# Altium PCB Two_Switch_Flyback.PcbDoc
Units mm, origin at the board's own origin, x right, y up, seen from the top; angles counter-clockwise.
Board outline 100 x 100 mm, 2 copper layers (Top Layer, Bottom Layer); 75 components, 28 nets, 186 pads, 20 vias.
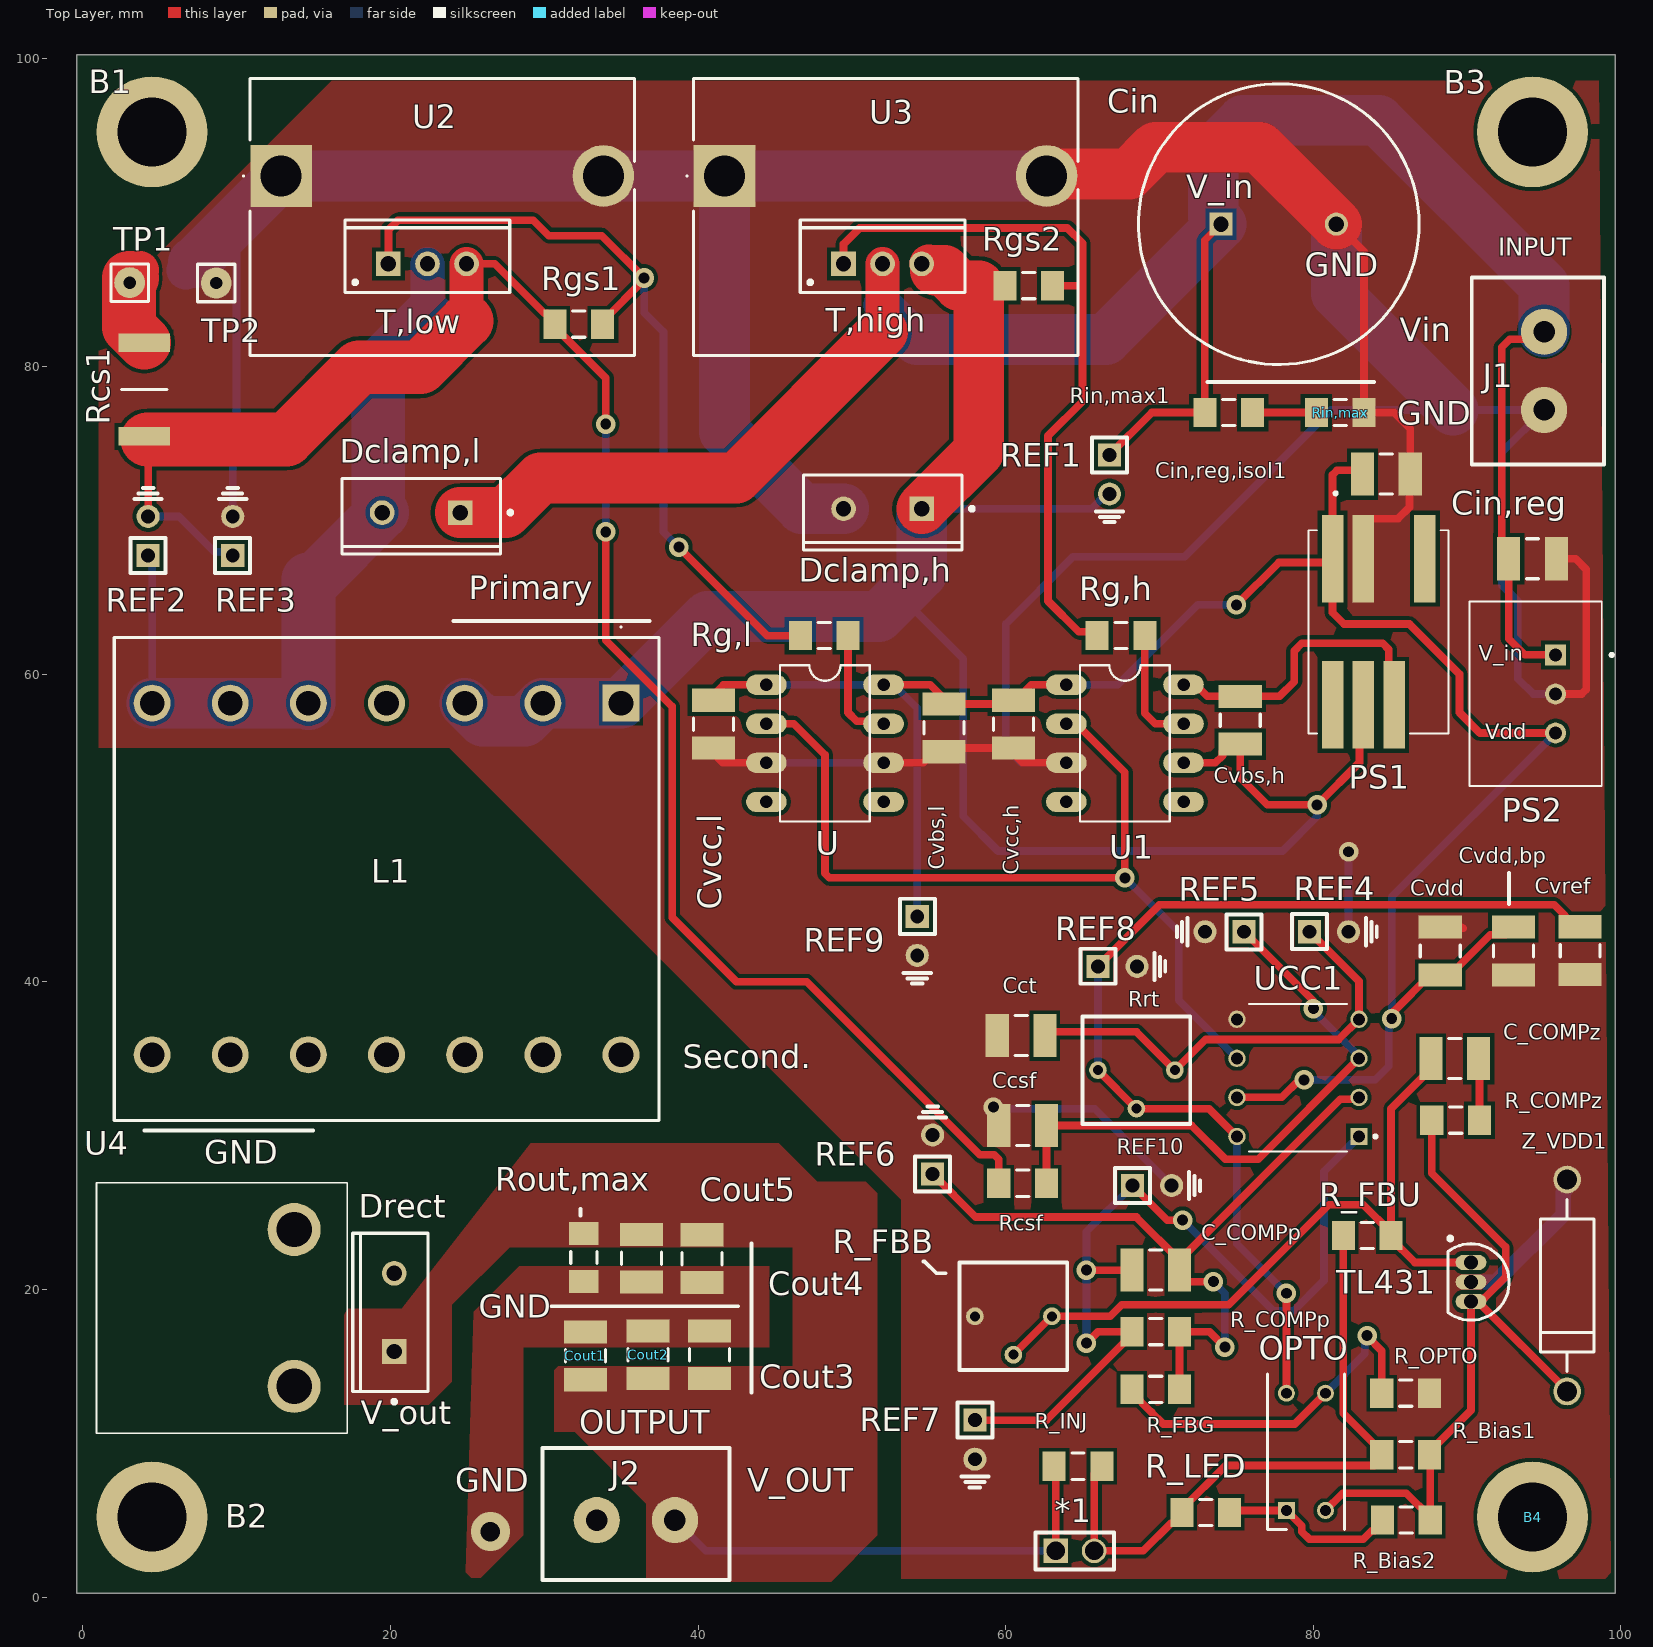
[diagram p0: Top Layer view]
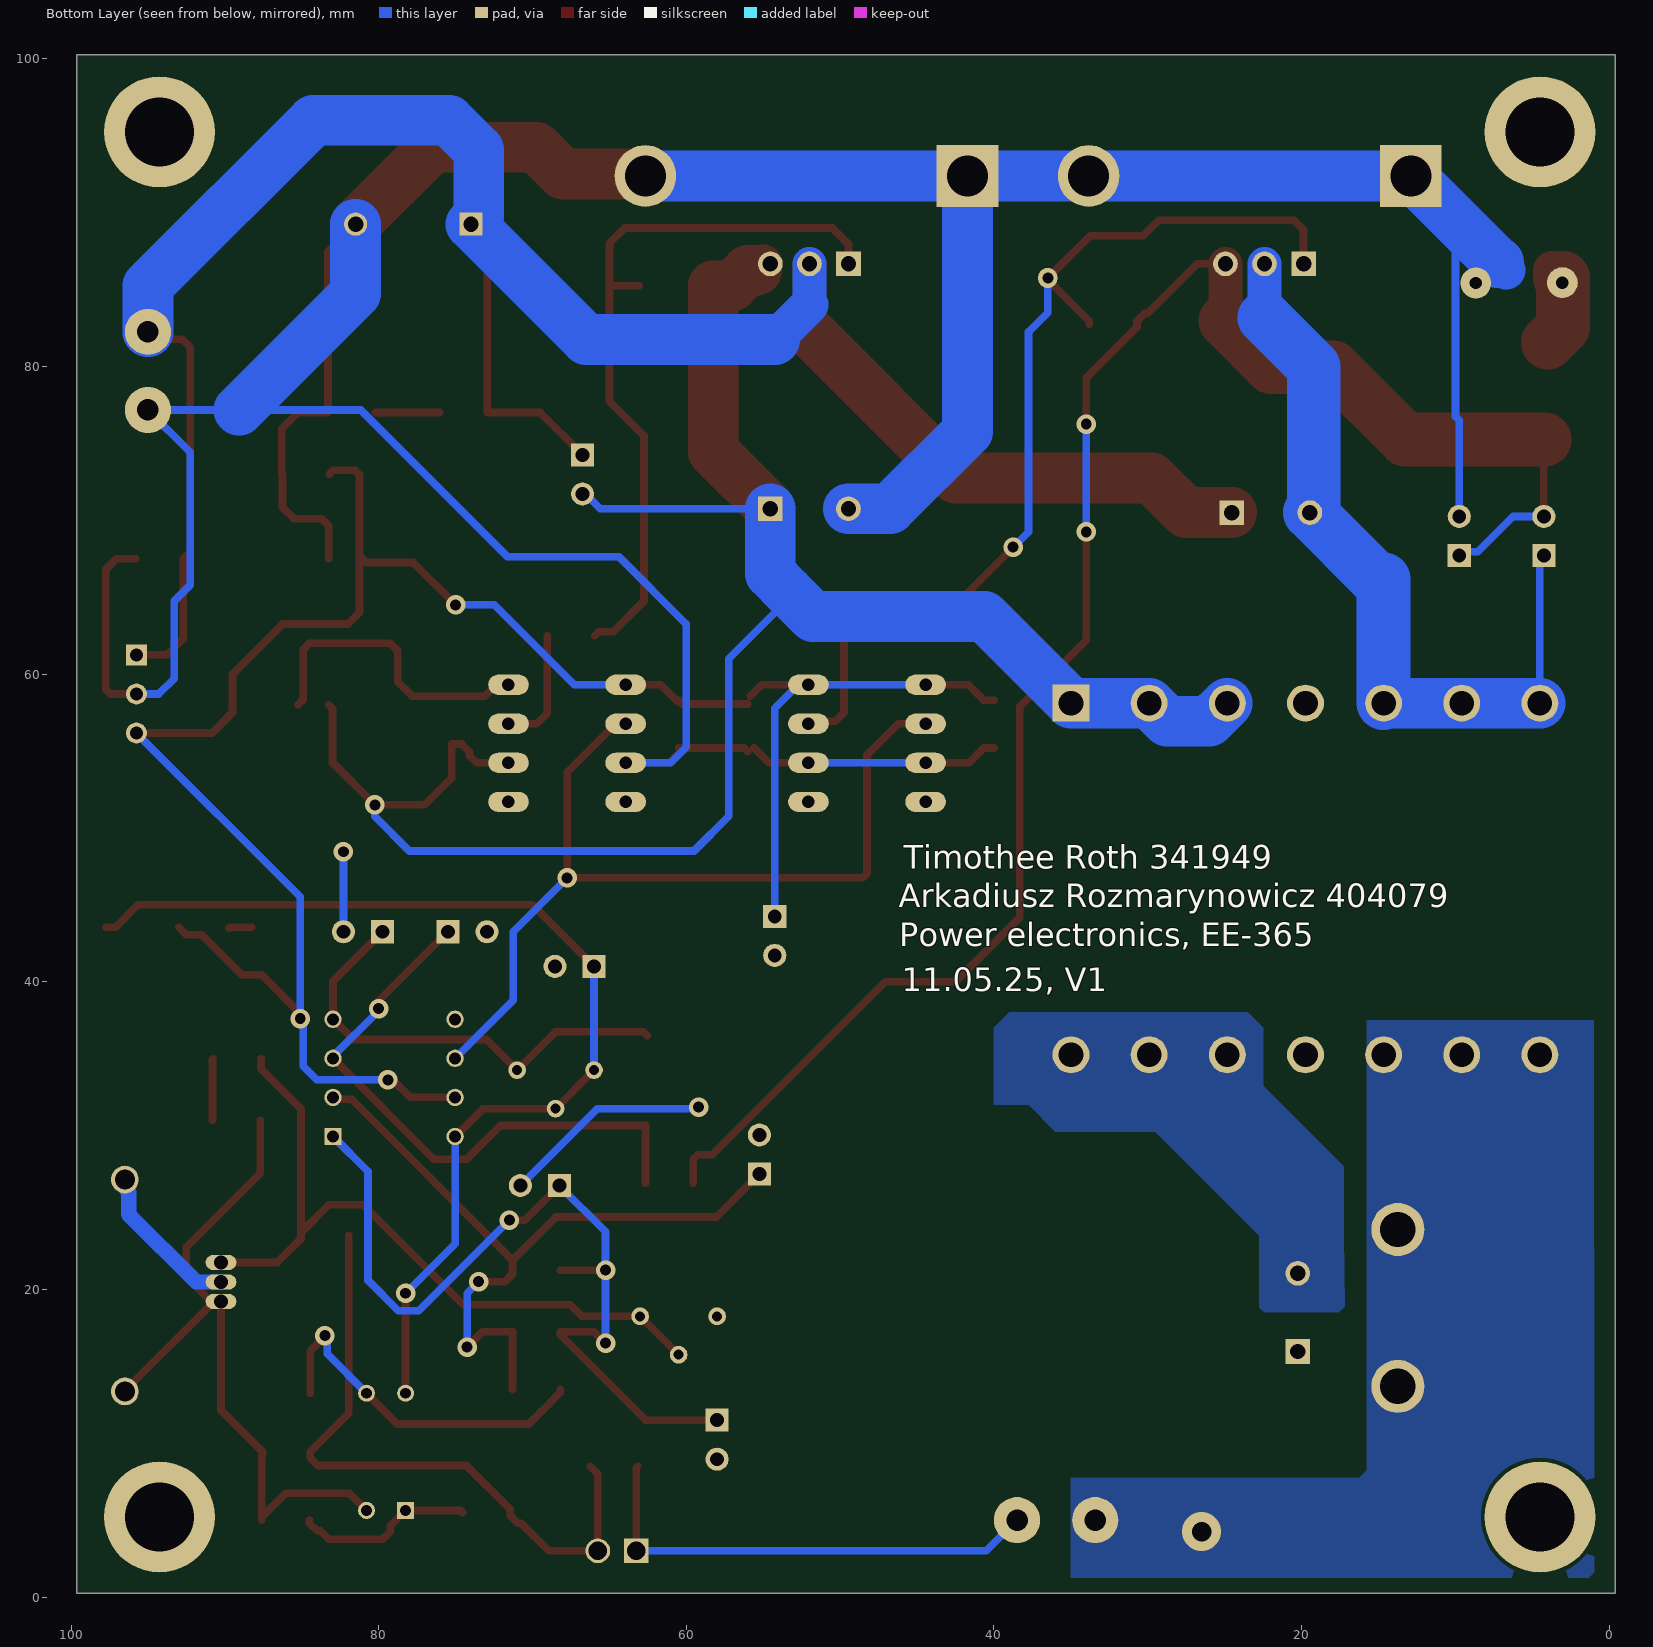
[diagram p1: Bottom Layer view, seen from below]

## Layer stack, top to bottom
Top Solder: solder mask 0.0102, Solder Resist, Dk 3.5
Top Layer: signal copper 0.0356
Dielectric 1: dielectric 0.32, FR-4, Dk 4.8
Bottom Layer: signal copper 0.0356
Bottom Solder: solder mask 0.0102, Solder Resist, Dk 3.5

## Board outline
-0.381,0.254 -0.381,100.254 99.619,100.254 99.619,0.254

## Design rules (kind name [scope] priority, off if disabled: settings)
Clearance [All] p1: gap=0.254 ignorepadtopadclearanceinfootprint=FALSE
Height [All] p1: minheight=-1 maxheight=1000 prefheight=12.7
PolygonConnect [All] p1: connectstyle=Direct reliefconductorwidth=0.254 reliefentries=4 polygonreliefangle="90 Angle" airgapwidth=0.254
RoutingVias [All] p1: holewidth=0.711 width=1.27 viastyle="Through Hole" minholewidth=0.711 minwidth=1.27 maxholewidth=0.711 maxwidth=1.27
SolderMaskExpansion [All] p1: expansion=0.102 istentingtop=FALSE
SupplyNets "Schematic Supply Nets_1" [InNet('GND_out')] p1: voltage=0.000
SupplyNets "Schematic Supply Nets_4" [InNet('Vout')] p2: voltage=0.000
SupplyNets "Schematic Supply Nets_3" [InNet('Vin')] p3: voltage=0.000
SupplyNets "Schematic Supply Nets_2" [InNet('Vdd')] p4: voltage=0.000
SupplyNets "Schematic Supply Nets" [InNet('GND')] p5: voltage=0.000
Width [All] p1: maxlimit=3.5 minlimit=0.5 preferedwidth=0.5 minimp=50.000000 maximp=50.000000 favimp=50.000000
29 further rules are at their usual default settings.

## Components (designator, comment, footprint, x,y, rotation, side; value= is the part's Value field where it differs from the comment)
*1 "Jinj" jumper 63.25,3 r90 top
B1 "" Hole#1 4.5,95.25 r0 top
B2 "" Hole#1 4.5,5.2 r0 top
B3 "" Hole#2 94.25,93.5 r0 top
B4 "" Hole#3 96,5.5 r0 top
C_COMPp "Capacitor (SMD)" SM/1210 69.75,21.25 r180 top
C_COMPz "Capacitor (SMD)" SM/1210 89.2,35 r180 top
Ccsf "Capacitor (SMD)" SM/1210 61.1,30.65 r180 top
Cct "capacitor smd" SM/1210 61,36.5 r180 top
Cin "108CKE100M" CAPPRD750W80D1825H4150 74,89.25 r0 top
Cin,reg "2,2uF 100V 1206" SM/1210 94.25,67.5 r0 top
Cin,reg,isol1 "2,2uF 100V 1210" SM/1210 84.75,73 r180 top
Cout1 "100u" SM/1210 32.675,15.675 r90 top
Cout2 "100u" SM/1210 36.75,15.75 r90 top
Cout3 "100u" SM/1210 40.75,15.75 r90 top
Cout4 "100u" SM/1210 40.25,22 r270 top
Cout5 "100u" SM/1210 36.325,22.025 r270 top
Cvbs,h "2.2uF 1206" SM/1210 75.25,57 r270 top
Cvbs,l "2.2uF 1206" SM/1210 56,56.5 r270 top
Cvcc,h "82nF 1206" SM/1210 60.5,56.75 r90 top
Cvcc,l "82nF 1206" SM/1210 41,56.75 r90 top
Cvdd "Capacitor (SMD)" SM/1210 88.25,42 r270 top
Cvdd,bp "Capacitor (SMD)" SM/1210 93,42 r90 top
Cvref "Capacitor (SMD)" SM/1210 97.35,42.025 r90 top
Dclamp,h "MBR10100G" TO-220AC 52,70.75 r270 top
Dclamp,l "MBR10100G" TO-220AC 22,70.5 r270 top
Drect "VT3045BP" TO-220AC 20.25,18.5 r180 top
J1 "" "PHOENIX  1755736" 95,82.25 r90 top
J2 "" "PHOENIX  1755736" 38.5,5 r0 top
L1 "B66232B1114T001" B66232B1114T001 34.99,58.11 r270 top
OPTO "VO617A-3" "DIP4 Socket" 78.25,5.63 r90 top
PS1 "TDN_1-4813WISM" CONV_TDN_1-4813WISM 84.25,62.75 r90 top
PS2 "TSR_0.6-48150WI" CONV_TSR_0.6-48150WI 94.45,58.71 r270 top
R_Bias1 "Resistor (SMD)" SM/1206 86,9.25 r180 top
R_Bias2 "Resistor (SMD)" SM/1206 86.05,5 r180 top
R_COMPp "Resistor (SMD)" SM/1206 69.75,17.25 r0 top
R_COMPz "Resistor (SMD)" SM/1206 89.25,31 r0 top
R_FBB "5k" "TRIMMER CT-6EP" 60.5,18.25 r180 top
R_FBG "Resistor (SMD)" SM/1206 69.75,13.5 r180 top
R_FBU "Resistor (SMD)" SM/1206 83.5,23.5 r180 top
R_INJ "Resistor (SMD)" SM/1206 64.7,8.5 r180 top
R_LED "Resistor (SMD)" SM/1206 73,5.5 r180 top
R_OPTO "Resistor (SMD)" SM/1206 86,13.25 r180 top
Rcs1 "CSRN2512FKR200" RESC6432X70N 4,78.5 r270 top
Rcsf "Resistor (SMD)" SM/1206 61.1,26.9 r0 top
REF1 "Test Point" "TESTPOINT HDR1X2" 66.75,74.25 r270 top
REF2 "Test Point" "TESTPOINT HDR1X2" 4.25,67.71 r90 top
REF3 "Test Point" "TESTPOINT HDR1X2" 9.75,67.71 r90 top
REF4 "Test Point" "TESTPOINT HDR1X2" 79.75,43.25 r0 top
REF5 "Test Point" "TESTPOINT HDR1X2" 75.5,43.25 r180 top
REF6 "Test Point" "TESTPOINT HDR1X2" 55.25,27.5 r90 top
REF7 "Test Point" "TESTPOINT HDR1X2" 58,11.5 r270 top
REF8 "Test Point" "TESTPOINT HDR1X2" 66,41 r0 top
REF9 "Test Point" "TESTPOINT HDR1X2" 54.25,44.25 r270 top
REF10 "Test Point" "TESTPOINT HDR1X2" 68.25,26.75 r0 top
Rg,h "Resistor (SMD)" SM/1206 67.5,62.5 r0 top
Rg,l "Resistor (SMD)" SM/1206 48.2,62.5 r0 top
Rgs1 "1206" SM/1206 32.25,82.75 r180 top
Rgs2 "1206" SM/1206 61.5,85.25 r0 top
Rin,max "Resistor (SMD)" SM/1206 81.75,77 r0 top
Rin,max1 "Resistor (SMD)" SM/1206 74.5,77 r0 top
Rout,max "Resistor (SMD)" SM/1206 32.575,22.075 r270 top
Rrt "5k" "TRIMMER CT-6EP" 68.5,34.25 r180 top
T,high "SiHF530" TO-220AB 51.995,86.667 r0 top locked
T,low "SiHF530" TO-220AB 22.411,86.667 r0 top locked
TL431 "TL431" "TO-92 Straight Lead" 90.25,20.48 r180 top
TP1 "net?" MY_TestPin 3.05,85.45 r90 top
TP2 "net?" MY_TestPin 8.675,85.425 r0 top
U "IR2117" DIL08 48.25,55.5 r270 top
U1 "IR2117" DIL08 67.75,55.5 r270 top
U2 "OMNI-220-18-25-1C" OMNI22018251C 12.901,92.382 r0 top locked
U3 "OMNI-220-18-25-1C" OMNI22018251C 41.723,92.382 r0 top
U4 "E2A-T220-25E" E2AT22025E 13.745,23.894 r180 top
UCC1 "PWM Controller" "UCCx8C4x PDIP Package" 79,33.75 r180 top
Z_VDD1 "D Zener" "DO-15 Package (D0-204AC)" 96.5,20.25 r90 top

## Footprints (in the part's own frame and the unit in brackets; to place one, negate y for a bottom-side part, rotate by r counter-clockwise, add the part's x,y. Pads: shape width x height; smd on the part's side, far side on the other; paste and mask are expansions set on the pad)
B66232B1114T001 [mm]
  rect 2.4x2.4 hole 1.6: 1(0,0)
  round 2.4 hole 1.6: 2(0,-5.08) 3(0,-10.16) 4(0,-15.24) 5(0,-20.32) 6(0,-25.4) 7(0,-30.48) 8(22.86,-30.48) 9(22.86,-25.4) 10(22.86,-20.32) 11(22.86,-15.24) 12(22.86,-10.16) 13(22.86,-5.08) 14(22.86,0)
  silkscreen extent -5,-32.94 27.13,2.46, body extent -4.27,-32.94 27.13,2.46, height 20.1
CAPPRD750W80D1825H4150 [mm]
  rect 1.5x1.5 hole 1: 1(0,0)
  round 1.5 hole 1: 2(7.5,0)
  silkscreen extent -5.37,-9.12 12.88,9.12, body extent -5.48,-9.24 13,9.24, height 41.5
CONV_TDN_1-4813WISM [mm]
  rect 5.7x1.4 smd: 1(4.75,3) 2(4.75,1) 4(4.75,-3) 5(-4.75,3) 6(-4.75,1) 7(-4.75,-1)
  silkscreen extent -6.6,-4.55 9.1,4.55, body extent -7.1,-4.55 7.1,4.55, height 10.2
CONV_TSR_0.6-48150WI [mm]
  rect 1.358x1.358 hole 0.85: 1(-2.54,1.3)
  round 1.358 hole 0.85: 2(0,1.3) 3(2.54,1.3)
  silkscreen extent -6,-4.3 6,5.05
DIL08 [mil]
  oval 52x104 hole 32: 1(-150,-150) 2(-50,-150) 3(50,-150) 4(150,-150) 5(150,150) 6(50,150) 7(-50,150) 8(-150,150)
  silkscreen extent -200,-115 200,115
"DIP4 Socket" [mm]
  rect 1.1x1.1 hole 0.7: 1(0,0)
  round 1.1 hole 0.7: 2(0,-2.54) 3(7.62,-2.54) 4(7.62,0)
  silkscreen extent -1.24,-3.77 8.86,1.23
"DO-15 Package (D0-204AC)" [mm]
  round 1.8 hole 1.3: 1(-6.887,0) 2(6.887,0)
  silkscreen extent -5.59,-1.75 5.59,1.75
E2AT22025E [mm]
  round 3.45 hole 2.3: 1(0,0) 2(0,10.2)
  silkscreen extent -3.45,-3.05 12.85,13.25, body extent -3.43,-3.02 12.85,13.24, height 25.67
Hole#1 [mm]
  round 7.2 hole 4.5: 1(0,0)
Hole#2 [mm]
  round 7.2 hole 4.5: 1(0,1.75)
Hole#3 [mm]
  round 7.2 hole 4.5: 1(-1.75,-0.3)
jumper [mm]
  rect 1.6x1.6 hole 1.2: 1(0,0)
  round 1.6 hole 1.2: 2(0,-2.5)
  silkscreen extent -1.2,-3.8 1.2,1.3
MY_TestPin [mil]
  round 79 hole 31.5: 1(0,0)
  silkscreen extent -48,-48 48,48
OMNI22018251C [mm]
  rect 4.005x4.005 hole 2.67: 1(0,0)
  round 4.005 hole 2.67: 2(20.94,0)
  silkscreen extent -2.5,-11.67 22.97,6.33, body extent -2.05,-14.94 22.95,6.66, height 35.82
"PHOENIX  1755736" [mm]
  round 3 hole 1.4: 1(0,0) 2(-5.08,0)
  silkscreen extent -8.62,-3.9 3.54,4.7, body extent -8.64,-3.92 3.52,4.68, height 12.01
RESC6432X70N [mm]
  rect 1.2x3.35 smd: 1(-3.05,0) 2(3.05,0)
  silkscreen extent 0,-1.48 0,1.48, body extent -3.17,-1.58 3.18,1.57, height 0.6
SM/1206 [mm]
  rect 1.5x1.9 smd: 1(-1.55,0) 2(1.55,0)
  silkscreen extent -0.4,-0.85 0.4,0.85, body extent -1.68,-0.87 1.68,0.87, height 0.71
SM/1210 [mm]
  rect 1.5x2.8 smd: 1(-1.55,0) 2(1.55,0)
  silkscreen extent -0.4,-1.3 0.4,1.3, body extent -1.7,-1.35 1.7,1.35, height 1.35
"TESTPOINT HDR1X2" [mm]
  rect 1.5x1.5 hole 0.9: 1(0,0)
  round 1.5 hole 0.9: 2(2.54,0)
  silkscreen extent -1.14,-1.13 4.38,1.14
"TO-92 Straight Lead" [mm]
  oval 2x1 hole 0.9: 1(0,-1.27) 2(0,0) 3(0,1.27)
  silkscreen extent -2.48,-2.95 1.5,2.48, body extent -2.48,-2.5 1.5,2.5, height 6.86
TO-220AB [mm]
  rect 1.6x1.6 hole 1: 1(-2.54,0)
  round 1.6 hole 1: 2(0,0) 3(2.54,0)
  silkscreen extent -5.35,-1.85 5.35,2.85, body extent -5.4,-1.9 5.4,2.9, height 19.3
TO-220AC [mm]
  rect 1.6x1.6 hole 1: 1(0,2.54)
  round 1.6 hole 1: 3(0,-2.54)
  silkscreen extent -2.2,-5.15 2.7,5.93, body extent -2.18,-5.15 2.67,5.15, height 19.05
"TRIMMER CT-6EP" [mm]
  round 1.15 hole 0.65: 1(-2.5,0) 2(0,2.5) 3(2.5,0)
  silkscreen extent -3.5,-3.5 3.5,3.5
"UCCx8C4x PDIP Package" [mm]
  rect 1.13x1.13 hole 0.78: 1(-3.97,3.81)
  round 1.13 hole 0.78: 2(-3.97,1.27) 3(-3.97,-1.27) 4(-3.97,-3.81) 5(3.97,-3.81) 6(3.97,-1.27) 7(3.97,1.27) 8(3.97,3.81)
  silkscreen extent -5.13,-4.79 3.18,4.79, body extent -5.23,-4.86 3.24,4.86, height 0.05

## Part data
*1: library part Jumper
B1 B2 B3 B4: library part Hole, "Single Terminal Socket"
C_COMPp C_COMPz Ccsf Cvdd Cvdd,bp Cvref: "Capacitor (non polarized)"
Cct Cin,reg Cin,reg,isol1 Cout1 Cout2 Cout3 Cout4 Cout5 Cvbs,h Cvbs,l Cvcc,h Cvcc,l: library part "Capacitor (SMD)", "Capacitor (non polarized)"
Cin: library part CMP-001-00083-1, "Capacitor Polarised", Manufacturer_Name="Cornell Dubilier", Mouser Part Number=598-108CKE100M, Datasheet Link=https://www.mouser.com/datasheet/2/88/ckh_cke-611140.pdf, Design Item ID=108CKE100M, Height=41.5mm, Manufacturer_Part_Number=108CKE100M, Mouser Price/Stock=https://www.mouser.co.uk/ProductDetail/CDE-Illinois-Capacitor/108CKE100M?qs=3tP%252BN51vMXfMIheRqHQC6Q%3D%3D, Source=SamacSys.SchLib
Dclamp,h Dclamp,l Drect: library part "Schottky Diode", "Schottky Diode"
J1 J2: library part Phoenix-1755736, "Connector 2 pos"
L1: "Inductor", Manufacturer_Name=TDK, Mouser Part Number=871-B66232B1114T001, Datasheet Link=https://product.tdk.com/system/files/dam/doc/product/ferrite/ferrite/ferrite-acc/data_sheet/80/db/fer/e_30_15_7.pdf, Height=20mm, Manufacturer_Part_Number=B66232B1114T001, Mouser Price/Stock=https://www.mouser.co.uk/ProductDetail/EPCOS-TDK/B66232B1114T001?qs=%2FsLciWRBLmBx8w3EjzXFqQ%3D%3D
OPTO: library part Optocoupler, "Optocoupler, Phototransistor Output, High Reliability, 5300 VRMS, -55 to 110 degC, 4-Pin DIP, RoHS, Tape and Reel"
PS1: "Convertidor CC-CC; Entrada (V) 18-75 VCC, Salida (VCC) 15 (A) 0,07", Package="SMD-8 Traco Power", Check_prices=https://www.snapeda.com/parts/TDN%201-4813WISM/Traco+Power/view-part/?ref=eda, MF="Traco Power", MP="TDN 1-4813WISM", SnapEDA_Link=https://www.snapeda.com/parts/TDN%201-4813WISM/Traco+Power/view-part/?ref=snap
PS2: Package=None, Availability=Unavailable, MP=TSR_0.6-48150WI, Price=None
R_Bias1 R_Bias2 R_COMPp R_COMPz R_FBG R_FBU R_INJ R_LED R_OPTO Rcsf Rg,h Rg,l Rin,max Rin,max1 Rout,max: "Resistor (Surface Mounted)"
R_FBB Rrt: library part "Variable Resistor", "Variable Resistor"
Rcs1: "Resistor", Manufacturer_Name="Stackpole Electronics", Arrow Part Number=CSRN2512FKR200, Arrow Price/Stock=https://www.arrow.com/en/products/csrn2512fkr200/stackpole-electronics?region=nac, Datasheet Link=https://cs.seielect.com/catalog/SEI-CSR_CSRN.pdf, Height=0.7mm, Manufacturer_Part_Number=CSRN2512FKR200
Rgs1 Rgs2: library part "Resistor (SMD)", "Resistor (Surface Mounted)"
T,high T,low: library part NMOS-2, "N-Channel Power MOSFET"
TL431: "Texas Instruments TL431 Adjustable Precision Shunt Regulator, 34 ppm / degC, 100 mA, -40 to 85 degC, 3-pin TO-92 (LP), Pb-Free (RoHS)", Manufacturer="Texas Instruments", Manufacturer Part Number=TL431ILP, Rating=Military, Temp Coeff(Max)(ppm/ degree C)=92, Temp Coeff(Typ)(ppm/ degree C)=34, Code_JEDEC=TO-226, ComponentLink1Description="Manufacturer URL", ComponentLink1URL=http://www.ti.com/, ComponentLink2Description=Datasheet, ComponentLink2URL=http://www.ti.com/general/docs/lit/getliterature.tsp?genericPartNumber=TL431&fileType=pdf, ComponentLink3Description="Package Specification", ComponentLink3URL=http://www.ti.com/litv/pdf/msot002a, DatasheetVersion=SLVS543M, Eco-Plan="Pb-Free (RoHS)", Initial Accuracy @ 25/deg C(%)=2, Iout/Iz(Max)(mA)=100, Min Iz for Regulation(uA)=600, Mounting Technology="Through Hole", PackageDescription="Plastic Cylindrical Package, Formed Lead Option (TO-92)", PackageReference=LP0003A, PackageVersion=4040001-2/C, PartNumber=TL431ILP, SubFamily="Shunt Voltage Reference", VO Adj(Max)(V)=36, VO Adj(Min)(V)=2.495
TP1 TP2: library part "Test Point_1", "Test point", ASiD Part Number="Test Point-AS"
U U1: "High-Side Gate Driver IC Non-Inverting 8-SOIC", Package="DIP-8 International Rectifier", Availability=Unavailable, MF=Infineon, MP=IR2117, Price=None, SnapEDA_Link=https://www.snapeda.com/parts/IR2117/Infineon%20Technologies/view-part/1671776/?ref=snap
U2 U3: "Undefined or Miscellaneous", Manufacturer_Name="Wakefield Thermal", Mouser Part Number=567-OMNI220-18-25-1C, Datasheet Link=https://wakefieldthermal.com/content/data_sheets/OMNIKLIP/omniKlip%20Wakefield%20Vette.pdf, Height=38mm, Manufacturer_Part_Number=OMNI-220-18-25-1C, Mouser Price/Stock=https://www.mouser.co.uk/ProductDetail/Wakefield-Thermal/OMNI-220-18-25-1C?qs=u4fy%2FsgLU9OPVK9dgaPYLQ%3D%3D
U4: "Undefined or Miscellaneous", Manufacturer_Name=Ohmite, Mouser Part Number=588-E2A-T220-25E, Datasheet Link=https://www.ohmite.com/assets/docs/sink_ex.pdf?r=false, Height=25.4mm, Manufacturer_Part_Number=E2A-T220-25E, Mouser Price/Stock=https://www.mouser.co.uk/ProductDetail/Ohmite/E2A-T220-25E?qs=Ey4jopcCj2q8O3LMZTmuTA%3D%3D
UCC1: library part UCCx8C4x, "Texas Instruments UCCx8C4x PWM Controller"
Z_VDD1: library part Zener, "Zener Diode"

## Via types
v1: diameter 1.27, hole 0.711, Top Layer to Bottom Layer, 19 vias
v2: diameter 2.54, hole 1.27, Top Layer to Bottom Layer, 1 vias

## Nets (pads, with @x,y where several pads share a name; then routed paths per layer and width w, separated by ;. In a path a pad name is that pad's centre, name@x,y a point inside that pad or via, vN(x,y) a via of type N, cw(c..) or ccw(c..) an arc to the next point about the centre after c; other vN are vias at no path point)
Comp: C_COMPp.2 R_COMPp.1 REF7.1 REF10.1 UCC1.1 | length 57.3
  Top Layer w0.5: REF7.1 62.65,11.5 68.2,17.05 R_COMPp.1 66,17.25 v1(65.25,16.5) ; v1(65.25,21.25) C_COMPp.2 ; REF10.1 70.5,24.5 v1(71.5,24.5)
  Bottom Layer w0.5: v1(65.25,16.5) v1(65.25,21.25) 65.25,23.75 REF10.1 ; v1(71.5,24.5) 77.389,18.611 78.722,18.611 80.688,20.578 80.688,27.658 UCC1.1
CS: Ccsf.1 Rcsf.2 REF5.1 UCC1.3 | length 39
  Top Layer w0.5: Rcsf.2 Ccsf.1 72.1,30.65 74.293,28.457 76.407,28.457 UCC1.3 ; REF5.1 80,38.75 v1(80,38.25)
  Bottom Layer w0.5: v1(80,38.25) 80,38.12 82.97,35.15 UCC1.3
FB: C_COMPp.1 R_COMPp.2 R_FBG.1 REF6.1 UCC1.2 | length 49.4
  Top Layer w0.5: REF6.1 58.05,24.7 68.5,24.7 C_COMPp.1@71.3,21.9 ; R_FBG.1 R_COMPp.2 73.25,17.25 v1(74.25,16.25) ; v1(73.5,20.5) 71.8,20.5 71.3,21 C_COMPp.1 C_COMPp.1@71.3,21.9 ; UCC1.2 82.849,32.359 81.759,32.359 C_COMPp.1@71.3,21.9
  Bottom Layer w0.5: v1(73.5,20.5) 74.25,19.75 v1(74.25,16.25)
GND: Ccsf.2 Cct.2 Cin,reg,isol1.1 Cin,reg.2 Cin.2 Cvbs,l.2 Cvcc,h.1 Cvcc,l.1 Cvdd,bp.1 Cvdd.1 Cvref.1 Dclamp,h.3 J1.2 PS1.2 PS2.2 R_FBB.3 R_OPTO.1 REF3.2 REF4.2 REF5.2 REF6.2 REF7.2 REF8.2 REF9.2 REF10.2 Rin,max.2 TL431.2 TP2.1 U1.3 U2.1 U2.2 U3.1 U3.2 U.3 U.6 UCC1.5 Z_VDD1.2 | length 311.2
  Top Layer w0.5: 40,55.2 40.65,55.2 41.62,54.23 U.3 ; U.6 54.63,54.23 55.6,55.2 ; 56,54.95 56.25,55.2 60.5,55.2 ; 60.4,54.95 61.12,54.23 U1.3 ; Cin.2 83.3,87.45 83.3,77 85.25,77 86.3,75.95 86.3,73 86.25,72.95 86.25,70.85 85.5,70.1 83.7,70.1 83.25,69.65 PS1.2 ; Cvdd.1 89.65,43.55 89.725,43.475 ; PS2.2 97.457,58.71 97.75,59.003 97.75,66.8 97.05,67.5 95.8,67.5
  Top Layer w3.3: U3.2 62.798,92.517 68.017,92.517 69.75,94.25 76.5,94.25 Cin.2
  Bottom Layer w0.5: REF3.2 9.75,76.5 10,76.75 10,89.481 ; U.3 U.6 ; v1(59.2,31.85) 59.3,31.75 65.79,31.75 REF10.2 ; U1.3 61.02,54.23 60,55.25 60,63.25 64.375,67.625 71.625,67.625 81.17,77.17 89.08,77.17 J1.2 92.25,74.42 92.25,65.793 93.293,64.75 93.293,59.707 94.29,58.71 PS2.2 ; REF4.2 82.29,48.44 v1(82.3,48.45) ; Z_VDD1.2@96.251,26.889 Z_VDD1.2
  Bottom Layer w1: TL431.2 91.855,20.48 96.251,24.876 96.251,26.323 96.347,26.419 96.347,26.793 Z_VDD1.2@96.251,26.889
  Bottom Layer w2.5: 6.704,86.25 7.204,86.75
  Bottom Layer w3.3: 7.204,86.75 7.269,86.75 10,89.481 U2.1 12.901,92.349 13,92.25 13.132,92.382 U2.2 U3.1 ; 49.46,70.75 46.75,70.75 41.723,75.777 U3.1 ; U3.2 U3.1 ; Cin.2 81.5,84.75 89.08,77.17
GND_out: Cout1.2 Cout2.2 Cout3.2 Cout4.2 Cout5.2 J2.2 L1.8 L1.9 L1.10 Rout,max.2 U4.1 U4.2 | length 0.5
  Top Layer w0.5: L1.10@14.67,34.736 L1.10
  other v2: 26.5,4.25
HighGate: Rg,h.1 Rgs2.2 T,high.1 | length 47.9
  Top Layer w0.5: 49.455,86.667 49.455,87.955 50.5,89 64,89 65,88 65,85.25 ; Rgs2.2 65,85.25 ; 65.95,62.5 65.693,62.757 64.743,62.757 62.75,64.75 62.75,75.5 65,77.75 65,85.25
Isolate_Vout+: Cvbs,h.1 PS1.7 U1.8 | length 20.8
  Top Layer w0.5: U1.8@72.22,59.31 U1.8 72.34,59.31 73.1,58.55 75.25,58.55 77.8,58.55 78.75,59.5 78.75,61.5 79.25,62 84.5,62 84.9,61.6 84.9,58.35 PS1.7
Isolate_Vout-: Cvbs,h.2 Dclamp,h.1 L1.1 L1.2 L1.3 PS1.6 REF1.2 Rgs2.1 T,high.3 U1.6 | length 132.7
  Top Layer w0.5: U1.6 73.631,54.23 74.1,54.699 74.1,54.95 74.6,55.45 75.25,55.45 75.25,53.25 77,51.5 v1(80.25,51.5) 83,54.25 83,57.75 PS1.6
  Top Layer w2.5: 54.999,86.667 55.416,86.25
  Top Layer w3.3: 54.54,70.75 58.25,74.46 58.25,85.25 57,85.25 56,86.25 55.416,86.25
  Bottom Layer w0.5: 53.375,65.375 53.375,64.875 57.25,61 57.25,50.75 59.5,48.5 78,48.5 80.25,50.75 v1(80.25,51.5) ; 54.54,70.75 65.589,70.75 66.549,71.71 REF1.2
  Bottom Layer w3.3: L1.3 26.003,56.937 28.737,56.937 L1.2 L1.1 40.63,63.75 51.75,63.75 53.375,65.375 54.54,66.54 54.54,70.75
LowGate: Rg,l.1 Rgs1.1 T,low.1 | length 53.5
  Top Layer w0.5: 19.871,86.667 19.871,88.871 20.5,89.5 29.293,89.5 30.293,88.5 33.75,88.5 v1(36.5,85.75) 36.5,85.65 33.8,82.95 Rgs1.1 ; v1(38.75,68.25) 44.5,62.5 46.65,62.5
  Bottom Layer w0.5: v1(36.5,85.75) 36.5,83.5 37.75,82.25 37.75,69.25 v1(38.75,68.25)
Net*1_2: *1.2 R_Bias1.2 R_FBU.2 R_INJ.1 R_LED.2 | length 42.6
  Top Layer w0.5: R_INJ.1 65.75,8 *1.2 68.95,3 70.75,4.8 70.95,4.8 71.45,5.3 R_LED.2 71.45,5.7 74.3,8.55 83.95,8.55 84.45,9.05 R_Bias1.2 84.45,9.45 81.95,11.95 R_FBU.2
NetC_COMPz_1: C_COMPz.1 R_COMPz.2 | length 4
  Top Layer w0.5: C_COMPz.1 90.8,34.95 R_COMPz.2
NetC_COMPz_2: C_COMPz.2 R_FBB.1 R_FBB.2 R_FBU.1 TL431.1 | length 48
  Top Layer w0.5: R_FBB.2 R_FBB.1 66.787,18.25 67.537,19 74.5,19 81,25.5 83.25,25.5 R_FBU.1@85.05,23.7 ; C_COMPz.2 87.65,34.35 85.05,31.75 R_FBU.1@85.05,23.7 ; TL431.1 86.6,21.75 85.05,23.3 R_FBU.1 R_FBU.1@85.05,23.7
NetDclamp,l_3: Dclamp,l.3 L1.5 L1.6 L1.7 REF2.1 T,low.2 | length 52.1
  Bottom Layer w0.5: REF2.1 4.51,67.45 L1.7
  Bottom Layer w2.2: 22.411,83.161 22.411,86.667
  Bottom Layer w3.3: L1.7 L1.6 L1.5
  Bottom Layer w3.5: L1.5 14.67,66.17 15.13,66.17 19.46,70.5 19.21,70.75 19.21,79.96 22.411,83.161
NetDrect_3: Drect.3 L1.12 L1.13 L1.14
NetOPTO_1: OPTO.1 R_Bias2.2 R_LED.1 | length 11.6
  Top Layer w0.5: R_LED.1 74.68,5.63 OPTO.1 79.257,4.623 79.257,4.243 79.75,3.75 83.25,3.75 83.8,4.3 84,4.3 84.5,4.8 R_Bias2.2
NetOPTO_2: OPTO.2 R_Bias1.1 R_Bias2.1 R_COMPz.1 TL431.3 Z_VDD1.1 | length 46.6
  Top Layer w0.5: OPTO.2 81.91,6.75 86.05,6.75 R_Bias2.1@87.6,5.2 ; R_Bias2.1 R_Bias2.1@87.6,5.2 ; R_COMPz.1 87.7,27.55 92.5,22.75 92.5,20.81 91.166,19.476 91.151,19.476 90.885,19.21 TL431.3@90.701,19.21 ; Z_VDD1.1 96.5,13.411 TL431.3@90.701,19.21 ; R_Bias2.1@87.6,5.2 87.6,9.2 R_Bias1.1 87.55,9.45 90.25,12.15 TL431.3 TL431.3@90.701,19.21
NetOPTO_3: OPTO.3 R_FBG.2 R_OPTO.2 | length 23.5
  Top Layer w0.5: R_FBG.2 68.2,13.3 69.475,12.025 70.25,11.25 78.79,11.25 OPTO.3 ; v1(83.5,17) 83.5,16.941 84.45,15.991 R_OPTO.2
  Bottom Layer w0.5: OPTO.3 83.353,15.813 83.353,16.853 v1(83.5,17)
NetRcs1_1: Rcs1.1 TP1.1 | length 5.5
  Top Layer w2.5: TP1.1@3.196,85.75 3.696,86.25
  Top Layer w3.5: TP1.1@3.196,85.75 3,85.75 3,82.55 Rcs1.1
NetRcs1_2: Rcs1.2 Rcsf.1 REF2.2 REF3.1 Rgs1.2 T,low.3 | length 119.1
  Top Layer w0.5: 4,76.5 4.25,76.25 REF2.2 ; 24.951,86.667 26.783,86.667 30,83.45 30.2,83.45 30.7,82.95 Rgs1.2 30.7,82.55 34,79.25 v1(34,76.25) ; v1(34,69.25) 34,62.213 38.324,57.889 38.324,44.176 42.5,40 47.063,40 58.317,28.746 59.257,28.746 59.55,28.453 Rcsf.1
  Top Layer w2.2: 24.951,82.951 24.951,86.667
  Top Layer w3.5: Rcs1.2@4.2,75.25 13.25,75.25 17.95,79.95 21.95,79.95 24.951,82.951
  Bottom Layer w0.5: REF2.2 6.25,70.25 8.543,67.957 9.503,67.957 REF3.1 ; v1(34,69.25) v1(34,76.25)
NetRg,h_2: Rg,h.2 U1.7 | length 7.8
  Top Layer w0.5: 69.05,62.5 69.05,57.45 69.73,56.77 U1.7
NetRg,l_2: Rg,l.2 U.7 | length 7.6
  Top Layer w0.5: 49.75,62.5 49.75,57.5 50.323,56.927 51.903,56.927 U.7
NetRin,max1_2: Rin,max1.2 Rin,max.1 | length 4.1
  Top Layer w0.5: 76.05,77 80.2,77
OutPWM: U1.2 U.2 UCC1.6 | length 58.7
  Top Layer w0.5: U.2 46.23,56.77 48.25,54.75 48.25,47.043 48.543,46.75 v1(67.75,46.75) 67.75,53.62 64.6,56.77 U1.2
  Bottom Layer w0.5: v1(67.75,46.75) 71.257,43.243 71.257,38.793 UCC1.6
RT/CT: Cct.1 REF4.1 Rrt.1 UCC1.4 | length 30
  Top Layer w0.5: Cct.1 62.8,36.75 68.5,36.75 Rrt.1 73,36.25 81.66,36.25 UCC1.4 82.97,40.03 REF4.1
Vdd: Cin,reg,isol1.2 Cvbs,l.1 Cvcc,h.2 Cvcc,l.2 Cvdd,bp.2 Cvdd.2 PS1.1 PS2.3 REF9.1 U1.1 U.1 U.8 UCC1.7 | length 139.5
  Top Layer w0.5: 40,58.3 40.65,58.3 41.66,59.31 U.1 ; U.8 55.09,59.31 55.85,58.55 ; 56,58.05 60.25,58.05 60.5,58.3 ; 60.575,58.225 61.66,59.31 U1.1 ; v1(75,64.5) 77.75,67.25 80.8,67.25 81.05,67.5 PS1.1 ; UCC1.7 77.955,32.48 79.1,33.625 v1(79.4,33.625) ; 83.2,73 82.95,73.25 81.543,73.25 81.25,72.957 PS1.1 ; v1(85.1,37.6) 85.247,37.747 85.247,38.097 87.6,40.45 Cvdd.2 88.9,40.45 91.5,43.05 92.5,43.05 93,43.55 ; PS2.3 90.83,56.17 89.5,57.5 89.5,60 86.25,63.25 82,63.25 81.25,64 PS1.1
  Bottom Layer w0.5: U.1 U.8 52.72,59.31 54.25,57.78 REF9.1 ; U1.1 67.291,59.31 72.481,64.5 v1(75,64.5) ; v1(79.4,33.625) 84.025,33.625 84.9,34.5 v1@84.9,37.375 ; v1(85.1,37.6) 85.1,45.52 PS2.3
Vin: Cin,reg.1 Cin.1 Dclamp,l.1 J1.1 PS2.1 REF1.1 Rin,max1.1 T,high.2 | length 146
  Top Layer w0.5: REF1.1 69.5,77 72.95,77 72.95,88.2 Cin.1 ; J1.1 94.522,81.772 92.772,81.772 92.25,81.25 92.25,67.95 92.7,67.5 92.7,62.3 93.75,61.25 PS2.1
  Top Layer w2.2: 51.995,82.255 51.995,86.667
  Top Layer w3.3: 24.54,70.5 27.5,70.5 29.75,72.75 42.49,72.75 51.995,82.255
  Bottom Layer w2.2: 51.995,84.005 51.995,86.667
  Bottom Layer w2.5: 51.995,84.005 54.25,81.75
  Bottom Layer w3.3: 54.25,81.75 66.5,81.75 Cin.1 73.5,89.75 73.5,94.067 75.433,96 84.25,96 95,85.25 J1.1
Vout: *1.1 Cout1.1 Cout2.1 Cout3.1 Cout4.1 Cout5.1 Drect.1 J2.1 R_INJ.2 Rout,max.1 | length 31.1
  Top Layer w0.5: R_INJ.2 63.25,8.4 *1.1
  Bottom Layer w0.5: J2.1 40.5,3 *1.1
Vref: Cvref.2 OPTO.4 REF8.1 Rrt.2 Rrt.3 UCC1.8 | length 69.6
  Top Layer w0.5: Rrt.3 Rrt.2 73.22,31.75 UCC1.8 ; REF8.1 70,45 95.65,45 97.1,43.55 Cvref.2@97.75,43.55 ; OPTO.4 v1(78.25,19.75)
  Bottom Layer w0.5: Rrt.3 REF8.1 ; UCC1.8 75.03,22.97 v1(78.25,19.75)
pads on no net: B1.1 B2.1 B3.1 B4.1 L1.4 L1.11 PS1.4 PS1.5 U1.4 U1.5 U.4 U.5

## Polygon pours and split planes (outlines as drawn)
GND_out on Bottom Layer "GND_OUT_L02_P001" (solid, pour order 1): 8.5,1.25 0.98,1.25 1,37.5 15.75,37.5 15.75,28.75 15.75,8.25 16.25,7.75 28.5,7.75 35,7.75 35,5.75 35,1.25 29.75,1.25 16.25,1.25
NetDrect_3 on Bottom Layer "NETDRECT_3_L02_P000" (solid, pour order 0): 17.25,23.5 17.25,28 22.5,33.25 22.5,37 23.5,38 39,38 40,37 40,32 37.75,32 36,30.25 29.5,30.25 22.75,23.5 22.75,18.82 22.43,18.5 17.489,18.5 17.195,18.794
GND on Top Layer "GND_L01_P010" (solid, pour order 10): 99.35,1.5 99.05,1.2 53.225,1.2 53.225,25.825 23.825,55.225 1.025,55.225 1.025,83.425 16.175,98.575 98.55,98.575
GND_out on Top Layer "GND_OUT_L01_P005" (solid, pour order 5): 44.625,21.5 28.375,21.5 25.422,18.547 24.889,1.25 25.875,1.25 28.625,4 28.625,16.25 44.625,16.25
Vout on Top Layer "VOUT_L01_P009" (solid, pour order 9): 31.977,10.75 36.648,6.078 36.648,1.25 36.898,1 48.648,1 51.648,4 51.648,26.25 50.898,27 46.148,27 45.898,26.75 46.148,26.5 46.148,15 30.898,15 30.648,14.75 30.648,10.75
Vout on Top Layer "VOUT_L01_P008" (solid, pour order 8): 17,12.5 22.5,12.5 24,14 24,19 27.75,22.75 47.25,22.75 47.75,22.25 47.75,27 45.25,29.5 29.138,29.5 20.75,18.75 17.239,18.75 17.195,18.794 17,18.599 17,12.75

## Silkscreen, mask and mechanical layers (free items; w line width, h text height)
Top Overlay:
  lines w0.254: 4.025,30.325 14.975,30.325 ; 24.1,63.45 36.85,63.45 ; 30.475,18.9 42.6,18.9 ; 32.35,24.8 32.35,25.225 ; 43.475,13.3 43.475,23 ; 54.65,21.825 54.725,21.825 55.5,21.05 55.75,21.05 56.1,21.05 ; 73.125,79 83.95,79 ; 92.725,45.05 92.725,47.075
  text "V_in" at 71.729,90.933 h1.52
  text "INPUT" at 92.025,86.8 h2
  text "GND" at 79.454,85.879 h1.52
  text "Vin" at 85.604,81.629 h1.52
  text "GND" at 85.454,76.204 h1.52
  text "Primary" at 25.079,64.862 h1.52
  text "V_in" at 90.754,60.871 h1
  text "Vdd" at 91.179,55.754 h1
  text "Second." at 39.004,34.379 h1.52
  text "GND" at 7.904,28.179 h1.52
  text "GND" at 25.754,18.154 h1.5
  text "V_out" at 18.079,11.233 h1.52
  text "OUTPUT" at 32.279,10.629 h1.52
  text "GND" at 24.229,6.854 h1.52
  text "V_OUT" at 43.204,6.833 h1.52
Bottom Overlay:
  text "Timothee Roth 341949" at 45.871,47.354 h1.52
  text "Arkadiusz Rozmarynowicz 404079" at 46.196,44.837 h1.52
  text "Power electronics, EE-365" at 46.146,42.312 h1.52
  text "11.05.25, V1" at 45.996,39.387 h1.52
Mechanical 1:
  lines w0.254: -2.99,89.617 7.845,89.617 ; 18.395,89.267 56.186,89.267 ; -0.381,0.254 99.619,0.254 99.619,100.254 -0.381,100.254 -0.381,0.254

## Dimensions
-0.381,0.254 to 99.619,0.254 on Mechanical 1
-0.381,0.254 to -0.381,100.254 on Mechanical 1